# Altium PCB CM5_RP2040_MZM.PcbDoc (part 3 of 5)
Units mil, origin at the board's own origin, x right, y up, seen from the top; angles counter-clockwise.
Board outline 4724.41 x 3543.31 mil, 4 copper layers (Top Layer, GND L2, GND L3, Bottom Layer), stack 62.992 mil thick; 227 components, 122 nets, 905 pads, 3083 vias.
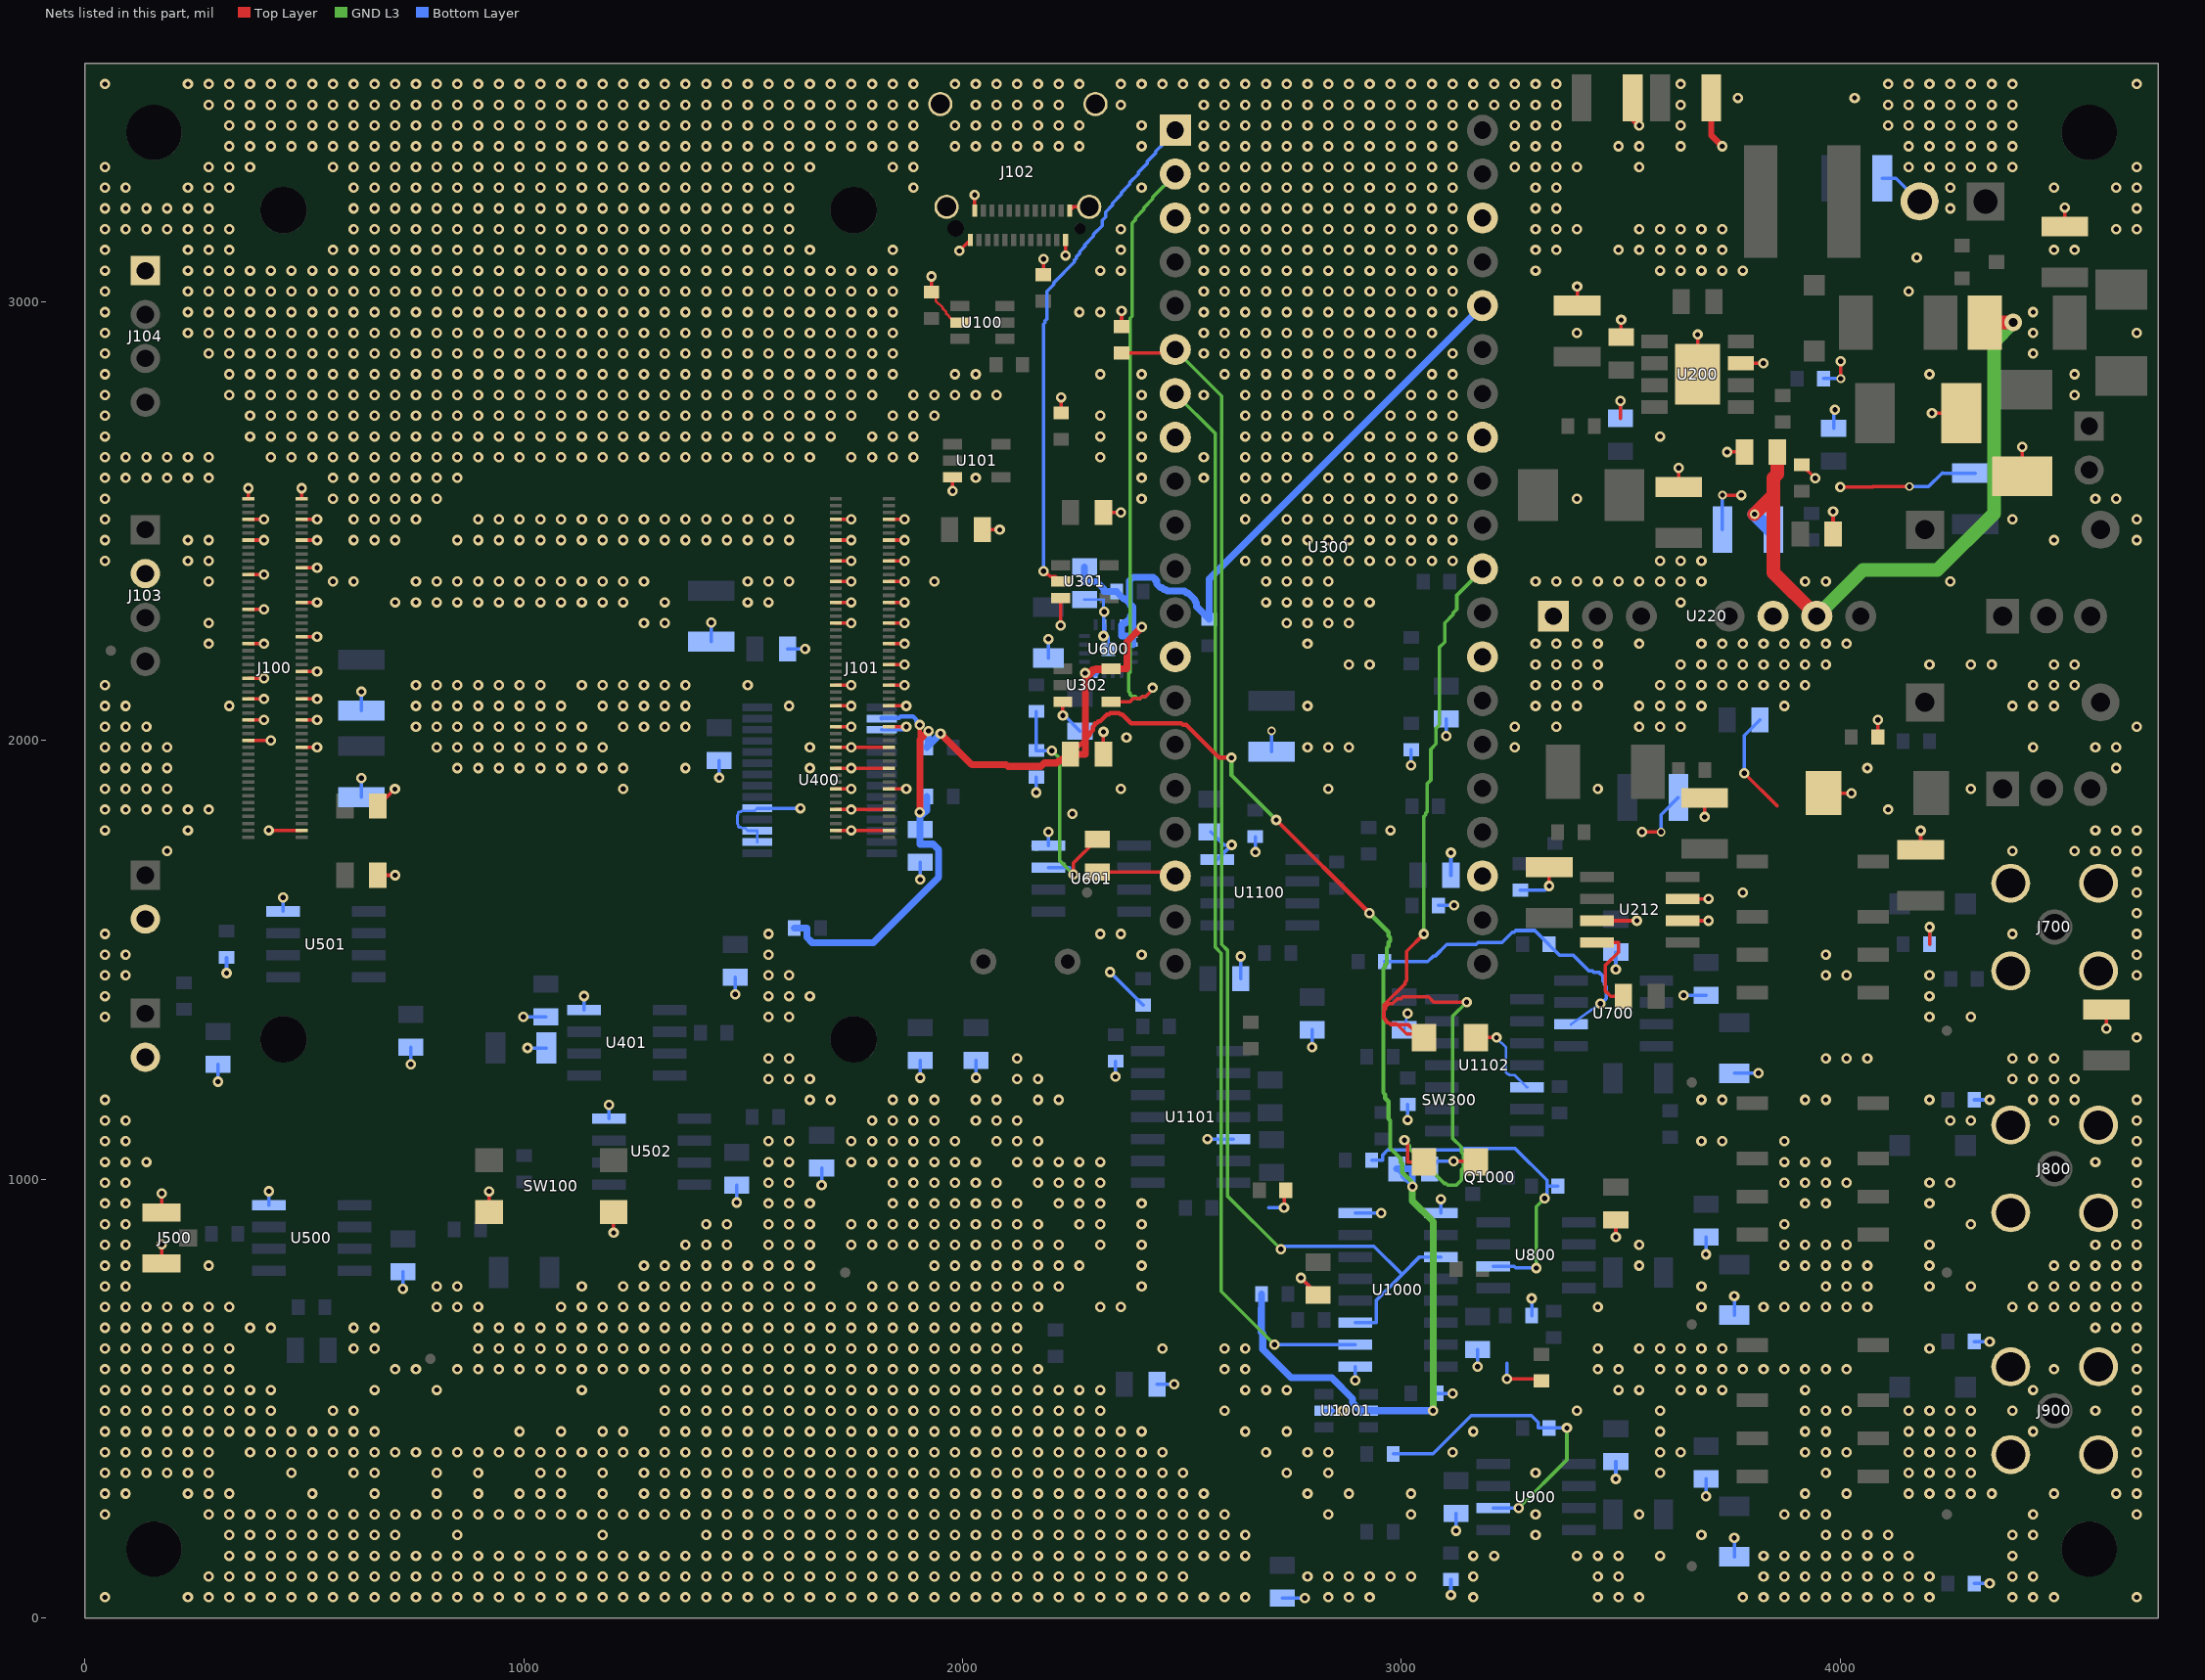
[diagram p5: the nets of this part, all layers, seen from the top]

## Via types
v1: diameter 23.62, hole 11.81, Top Layer to Bottom Layer, tented both sides, 3043 vias
v2: diameter 39.37, hole 19.68, Top Layer to Bottom Layer, tented both sides, 22 vias
v3: diameter 19.68, hole 11.81, Top Layer to Bottom Layer, tented both sides, 14 vias
v4: diameter 21.65, hole 11.81, Top Layer to Bottom Layer, tented both sides, 4 vias

## Nets (pads, with @x,y where several pads share a name; then routed paths per layer and width w, separated by ;. In a path a pad name is that pad's centre, name@x,y a point inside that pad or via, vN(x,y) a via of type N, cw(c..) or ccw(c..) an arc to the next point about the centre after c; other vN are vias at no path point) (continued)
GND: (continued)
  other v1: 45.67,47.24 234.65,47.24 281.89,47.24 329.13,47.24 376.38,47.24 423.62,47.24 470.87,47.24 518.11,47.24 565.35,47.24 612.6,47.24 659.84,47.24 707.09,47.24 754.33,47.24 801.57,47.24 848.82,47.24 896.06,47.24 943.31,47.24 990.55,47.24 1037.8,47.24 1085.04,47.24 1132.28,47.24 1179.53,47.24 1226.77,47.24 1274.02,47.24 1321.26,47.24 1368.5,47.24 1415.75,47.24 1462.99,47.24 1510.24,47.24 1557.48,47.24 1604.72,47.24 1651.97,47.24 1699.21,47.24 1746.46,47.24 1793.7,47.24 1840.94,47.24 1888.19,47.24 1935.43,47.24 1982.68,47.24 2029.92,47.24 2077.17,47.24 2124.41,47.24 2171.65,47.24 2218.9,47.24 2266.14,47.24 2313.39,47.24 2360.63,47.24 2407.87,47.24 2455.12,47.24 2502.36,47.24 2549.61,47.24 2596.85,47.24 2644.09,47.24 2833.07,47.24 2880.32,47.24 2927.56,47.24 3163.78,47.24 3447.24,47.24 3494.49,47.24 3541.73,47.24 3777.95,47.24 3825.2,47.24 3872.44,47.24 3919.68,47.24 3966.93,47.24 4014.17,47.24 4061.42,47.24 4108.66,47.24 4155.91,47.24 4203.15,47.24 4392.13,47.24 4439.37,47.24 4486.61,47.24 4675.59,47.24 281.89,94.49 329.13,94.49 376.38,94.49 423.62,94.49 470.87,94.49 518.11,94.49 565.35,94.49 612.6,94.49 659.84,94.49 707.09,94.49 754.33,94.49 801.57,94.49 848.82,94.49 896.06,94.49 943.31,94.49 990.55,94.49 1037.8,94.49 1085.04,94.49 1132.28,94.49 1179.53,94.49 1226.77,94.49 1274.02,94.49 1321.26,94.49 1368.5,94.49 1415.75,94.49 1462.99,94.49 1510.24,94.49 1557.48,94.49 1604.72,94.49 1651.97,94.49 1699.21,94.49 1746.46,94.49 1793.7,94.49 1840.94,94.49 1888.19,94.49 1935.43,94.49 1982.68,94.49 2029.92,94.49 2077.17,94.49 2124.41,94.49 2171.65,94.49 2218.9,94.49 2266.14,94.49 2313.39,94.49 2360.63,94.49 2407.87,94.49 2455.12,94.49 2502.36,94.49 2785.83,94.49 2833.07,94.49 2880.32,94.49 2927.56,94.49 2974.8,94.49 3022.05,94.49 3163.78,94.49 3447.24,94.49 3494.49,94.49 3825.2,94.49 3872.44,94.49 3919.68,94.49 3966.93,94.49 4014.17,94.49 4061.42,94.49 4108.66,94.49 4155.91,94.49 4203.15,94.49 4392.13,94.49 4439.37,94.49 329.13,141.73 376.38,141.73 423.62,141.73 470.87,141.73 518.11,141.73 565.35,141.73 612.6,141.73 659.84,141.73 707.09,141.73 754.33,141.73 801.57,141.73 848.82,141.73 896.06,141.73 943.31,141.73 990.55,141.73 1037.8,141.73 1085.04,141.73 1132.28,141.73 1179.53,141.73 1226.77,141.73 1274.02,141.73 1321.26,141.73 1368.5,141.73 1415.75,141.73 1462.99,141.73 1510.24,141.73 1557.48,141.73 1604.72,141.73 1651.97,141.73 1699.21,141.73 1746.46,141.73 1793.7,141.73 1840.94,141.73 1888.19,141.73 1935.43,141.73 1982.68,141.73 2029.92,141.73 2077.17,141.73 2124.41,141.73 2171.65,141.73 2218.9,141.73 2266.14,141.73 2313.39,141.73 2360.63,141.73 2407.87,141.73 2455.12,141.73 2502.36,141.73 2549.61,141.73 2596.85,141.73 2644.09,141.73 3163.78,141.73 3211.02,141.73 3400,141.73 3447.24,141.73 3494.49,141.73 3588.98,141.73 3825.2,141.73 3872.44,141.73 3919.68,141.73 3966.93,141.73 4014.17,141.73 4061.42,141.73 4108.66,141.73 4155.91,141.73 4392.13,141.73 329.13,188.98 376.38,188.98 423.62,188.98 470.87,188.98 518.11,188.98 565.35,188.98 612.6,188.98 659.84,188.98 707.09,188.98 848.82,188.98 1179.53,188.98 1415.75,188.98 1462.99,188.98 1510.24,188.98 1557.48,188.98 1604.72,188.98 1651.97,188.98 1699.21,188.98 1746.46,188.98 1793.7,188.98 1840.94,188.98 1888.19,188.98 1935.43,188.98 1982.68,188.98 2029.92,188.98 2077.17,188.98 2124.41,188.98 2171.65,188.98 2218.9,188.98 2266.14,188.98 2313.39,188.98 2360.63,188.98 2407.87,188.98 2455.12,188.98 2502.36,188.98 2549.61,188.98 2596.85,188.98 2644.09,188.98 3305.51,188.98 3683.46,188.98 3966.93,188.98 4014.17,188.98 4061.42,188.98 4108.66,188.98 4392.13,188.98 4439.37,188.98 45.67,236.22 281.89,236.22 329.13,236.22 376.38,236.22 423.62,236.22 470.87,236.22 518.11,236.22 565.35,236.22 612.6,236.22 659.84,236.22 707.09,236.22 754.33,236.22 801.57,236.22 848.82,236.22 896.06,236.22 943.31,236.22 990.55,236.22 1037.8,236.22 1085.04,236.22 1132.28,236.22 1179.53,236.22 1226.77,236.22 1274.02,236.22 1321.26,236.22 1368.5,236.22 1415.75,236.22 1462.99,236.22 1510.24,236.22 1557.48,236.22 1604.72,236.22 1651.97,236.22 1699.21,236.22 1746.46,236.22 1793.7,236.22 1840.94,236.22 1888.19,236.22 1935.43,236.22 1982.68,236.22 2029.92,236.22 2077.17,236.22 2124.41,236.22 2171.65,236.22 2218.9,236.22 2266.14,236.22 2313.39,236.22 2360.63,236.22 2407.87,236.22 2455.12,236.22 2502.36,236.22 2549.61,236.22 2596.85,236.22 2833.07,236.22 3022.05,236.22 3305.51,236.22 3541.73,236.22 3872.44,236.22 3919.68,236.22 3966.93,236.22 4439.37,236.22 4675.59,236.22 45.67,283.46 92.91,283.46 234.65,283.46 281.89,283.46 329.13,283.46 518.11,283.46 659.84,283.46 801.57,283.46 896.06,283.46 990.55,283.46 1037.8,283.46 1085.04,283.46 1179.53,283.46 1274.02,283.46 1321.26,283.46 1368.5,283.46 1415.75,283.46 1462.99,283.46 1510.24,283.46 1557.48,283.46 1604.72,283.46 1651.97,283.46 1699.21,283.46 1746.46,283.46 1793.7,283.46 1840.94,283.46 1888.19,283.46 1935.43,283.46 1982.68,283.46 2029.92,283.46 2077.17,283.46 2124.41,283.46 2171.65,283.46 2218.9,283.46 2266.14,283.46 2313.39,283.46 2360.63,283.46 2407.87,283.46 2455.12,283.46 2502.36,283.46 2549.61,283.46 2785.83,283.46 2880.32,283.46 3022.05,283.46 3919.68,283.46 4014.17,283.46 4155.91,283.46 4203.15,283.46 4250.39,283.46 4297.64,283.46 4344.88,283.46 4486.61,283.46 4628.35,283.46 4675.59,283.46 45.67,330.71 92.91,330.71 140.16,330.71 187.4,330.71 234.65,330.71 281.89,330.71 470.87,330.71 612.6,330.71 659.84,330.71 801.57,330.71 896.06,330.71 1037.8,330.71 1085.04,330.71 1179.53,330.71 1274.02,330.71 1321.26,330.71 1368.5,330.71 1415.75,330.71 1462.99,330.71 1510.24,330.71 1557.48,330.71 1604.72,330.71 1651.97,330.71 1699.21,330.71 1746.46,330.71 1793.7,330.71 1840.94,330.71 1888.19,330.71 1935.43,330.71 1982.68,330.71 2029.92,330.71 2077.17,330.71 2124.41,330.71 2171.65,330.71 2218.9,330.71 2266.14,330.71 2313.39,330.71 2360.63,330.71 2407.87,330.71 2455.12,330.71 2502.36,330.71 2738.58,330.71 2833.07,330.71 3305.51,330.71 3588.98,330.71 3966.93,330.71 4155.91,330.71 4203.15,330.71 4250.39,330.71 4297.64,330.71 4675.59,330.71 45.67,377.95 92.91,377.95 140.16,377.95 187.4,377.95 234.65,377.95 281.89,377.95 376.38,377.95 423.62,377.95 470.87,377.95 518.11,377.95 565.35,377.95 612.6,377.95 659.84,377.95 707.09,377.95 754.33,377.95 801.57,377.95 848.82,377.95 896.06,377.95 943.31,377.95 990.55,377.95 1037.8,377.95 1085.04,377.95 1132.28,377.95 1179.53,377.95 1226.77,377.95 1274.02,377.95 1321.26,377.95 1368.5,377.95 1415.75,377.95 1462.99,377.95 1510.24,377.95 1557.48,377.95 1604.72,377.95 1651.97,377.95 1699.21,377.95 1746.46,377.95 1793.7,377.95 1840.94,377.95 1888.19,377.95 1935.43,377.95 1982.68,377.95 2029.92,377.95 2077.17,377.95 2124.41,377.95 2171.65,377.95 2218.9,377.95 2266.14,377.95 2313.39,377.95 2360.63,377.95 2407.87,377.95 2455.12,377.95 2691.34,377.95 2785.83,377.95 2833.07,377.95 3116.54,377.95 3588.98,377.95 3636.22,377.95 3919.68,377.95 3966.93,377.95 4014.17,377.95 4155.91,377.95 4203.15,377.95 4250.39,377.95 4297.64,377.95 4675.59,377.95 45.67,425.2 92.91,425.2 140.16,425.2 187.4,425.2 234.65,425.2 281.89,425.2 329.13,425.2 376.38,425.2 423.62,425.2 470.87,425.2 518.11,425.2 565.35,425.2 612.6,425.2 659.84,425.2 990.55,425.2 1085.04,425.2 1179.53,425.2 1226.77,425.2 1321.26,425.2 1368.5,425.2 1415.75,425.2 1462.99,425.2 1510.24,425.2 1557.48,425.2 1604.72,425.2 1651.97,425.2 1699.21,425.2 1746.46,425.2 1793.7,425.2 1840.94,425.2 1888.19,425.2 1935.43,425.2 1982.68,425.2 2029.92,425.2 2077.17,425.2 2124.41,425.2 2171.65,425.2 2218.9,425.2 2266.14,425.2 2313.39,425.2 2360.63,425.2 2407.87,425.2 2644.09,425.2 2738.58,425.2 3163.78,425.2 3588.98,425.2 3919.68,425.2 3966.93,425.2 4155.91,425.2 4203.15,425.2 4250.39,425.2 4297.64,425.2 4439.37,425.2 4675.59,425.2 45.67,472.44 92.91,472.44 140.16,472.44 187.4,472.44 234.65,472.44 281.89,472.44 329.13,472.44 376.38,472.44 423.62,472.44 565.35,472.44 612.6,472.44 1321.26,472.44 1368.5,472.44 1415.75,472.44 1462.99,472.44 1510.24,472.44 1557.48,472.44 1604.72,472.44 1651.97,472.44 1699.21,472.44 1746.46,472.44 1793.7,472.44 1840.94,472.44 1888.19,472.44 1935.43,472.44 1982.68,472.44 2029.92,472.44 2077.17,472.44 2124.41,472.44 2171.65,472.44 2218.9,472.44 2266.14,472.44 2313.39,472.44 2596.85,472.44 3400,472.44 3588.98,472.44 3919.68,472.44 3966.93,472.44 4014.17,472.44 4155.91,472.44 4203.15,472.44 4250.39,472.44 4297.64,472.44 4392.13,472.44 4581.1,472.44 4675.59,472.44 45.67,519.68 92.91,519.68 140.16,519.68 187.4,519.68 234.65,519.68 281.89,519.68 329.13,519.68 376.38,519.68 423.62,519.68 659.84,519.68 801.57,519.68 1132.28,519.68 1321.26,519.68 1368.5,519.68 1415.75,519.68 1462.99,519.68 1510.24,519.68 1557.48,519.68 1604.72,519.68 1651.97,519.68 1699.21,519.68 1746.46,519.68 1793.7,519.68 1840.94,519.68 1888.19,519.68 1935.43,519.68 1982.68,519.68 2029.92,519.68 2077.17,519.68 2124.41,519.68 2171.65,519.68 2218.9,519.68 2266.14,519.68 2313.39,519.68 2644.09,519.68 2691.34,519.68 2738.58,519.68 3494.49,519.68 3541.73,519.68 3636.22,519.68 3683.46,519.68 3730.71,519.68 3919.68,519.68 4439.37,519.68 4675.59,519.68 45.67,566.93 92.91,566.93 140.16,566.93 187.4,566.93 234.65,566.93 281.89,566.93 329.13,566.93 707.09,566.93 754.33,566.93 848.82,566.93 896.06,566.93 943.31,566.93 990.55,566.93 1037.8,566.93 1085.04,566.93 1132.28,566.93 1179.53,566.93 1226.77,566.93 1274.02,566.93 1321.26,566.93 1368.5,566.93 1415.75,566.93 1462.99,566.93 1510.24,566.93 1557.48,566.93 1604.72,566.93 1651.97,566.93 1699.21,566.93 1746.46,566.93 1793.7,566.93 1840.94,566.93 1888.19,566.93 1935.43,566.93 1982.68,566.93 2029.92,566.93 2077.17,566.93 2124.41,566.93 2171.65,566.93 2596.85,566.93 2644.09,566.93 3447.24,566.93 3494.49,566.93 3588.98,566.93 3636.22,566.93 3683.46,566.93 3730.71,566.93 3777.95,566.93 3825.2,566.93 3872.44,566.93 3919.68,566.93 3966.93,566.93 4014.17,566.93 4486.61,566.93 4675.59,566.93 45.67,614.17 92.91,614.17 140.16,614.17 187.4,614.17 234.65,614.17 281.89,614.17 329.13,614.17 612.6,614.17 659.84,614.17 896.06,614.17 943.31,614.17 990.55,614.17 1037.8,614.17 1085.04,614.17 1132.28,614.17 1179.53,614.17 1226.77,614.17 1274.02,614.17 1321.26,614.17 1368.5,614.17 1415.75,614.17 1462.99,614.17 1510.24,614.17 1557.48,614.17 1604.72,614.17 1651.97,614.17 1699.21,614.17 1746.46,614.17 1793.7,614.17 1840.94,614.17 1888.19,614.17 1935.43,614.17 1982.68,614.17 2029.92,614.17 2077.17,614.17 2124.41,614.17 2455.12,614.17 2596.85,614.17 2644.09,614.17 3447.24,614.17 3541.73,614.17 3588.98,614.17 3636.22,614.17 3683.46,614.17 3730.71,614.17 4203.15,614.17 4675.59,614.17 45.67,661.42 92.91,661.42 140.16,661.42 187.4,661.42 234.65,661.42 281.89,661.42 376.38,661.42 423.62,661.42 612.6,661.42 659.84,661.42 896.06,661.42 943.31,661.42 990.55,661.42 1037.8,661.42 1085.04,661.42 1132.28,661.42 1179.53,661.42 1226.77,661.42 1274.02,661.42 1321.26,661.42 1368.5,661.42 1415.75,661.42 1462.99,661.42 1510.24,661.42 1557.48,661.42 1604.72,661.42 1651.97,661.42 1699.21,661.42 1746.46,661.42 1793.7,661.42 1840.94,661.42 1888.19,661.42 1935.43,661.42 1982.68,661.42 2029.92,661.42 2077.17,661.42 2124.41,661.42 4581.1,661.42 4628.35,661.42 4675.59,661.42 45.67,708.66 92.91,708.66 140.16,708.66 187.4,708.66 234.65,708.66 281.89,708.66 329.13,708.66 801.57,708.66 848.82,708.66 896.06,708.66 1085.04,708.66 1132.28,708.66 1179.53,708.66 1226.77,708.66 1274.02,708.66 1321.26,708.66 1368.5,708.66 1415.75,708.66 1462.99,708.66 1510.24,708.66 1557.48,708.66 1604.72,708.66 1651.97,708.66 1699.21,708.66 1746.46,708.66 1793.7,708.66 1840.94,708.66 1888.19,708.66 1935.43,708.66 1982.68,708.66 2029.92,708.66 2077.17,708.66 2124.41,708.66 2171.65,708.66 2313.39,708.66 2360.63,708.66 3447.24,708.66 3683.46,708.66 3825.2,708.66 3872.44,708.66 3919.68,708.66 3966.93,708.66 4014.17,708.66 4061.42,708.66 4392.13,708.66 4439.37,708.66 4486.61,708.66 4533.86,708.66 4581.1,708.66 4628.35,708.66 4675.59,708.66 45.67,755.91 92.91,755.91 801.57,755.91 848.82,755.91 1132.28,755.91 1226.77,755.91 1274.02,755.91 1321.26,755.91 1368.5,755.91 1415.75,755.91 1462.99,755.91 1510.24,755.91 1557.48,755.91 1604.72,755.91 1651.97,755.91 1793.7,755.91 1840.94,755.91 1888.19,755.91 1935.43,755.91 1982.68,755.91 2029.92,755.91 2077.17,755.91 2124.41,755.91 2171.65,755.91 2218.9,755.91 2407.87,755.91 3683.46,755.91 3966.93,755.91 4014.17,755.91 4061.42,755.91 4203.15,755.91 4297.64,755.91 4439.37,755.91 4486.61,755.91 4533.86,755.91 4581.1,755.91 4628.35,755.91 4675.59,755.91 45.67,803.15 92.91,803.15 281.89,803.15 1274.02,803.15 1321.26,803.15 1368.5,803.15 1415.75,803.15 1462.99,803.15 1510.24,803.15 1557.48,803.15 1604.72,803.15 1651.97,803.15 1935.43,803.15 1982.68,803.15 2029.92,803.15 2077.17,803.15 2124.41,803.15 2171.65,803.15 2218.9,803.15 2266.14,803.15 2407.87,803.15 3541.73,803.15 3872.44,803.15 3919.68,803.15 3966.93,803.15 4014.17,803.15 4061.42,803.15 4203.15,803.15 4486.61,803.15 4533.86,803.15 4581.1,803.15 4628.35,803.15 4675.59,803.15 45.67,850.39 92.91,850.39 1368.5,850.39 1415.75,850.39 1462.99,850.39 1557.48,850.39 1604.72,850.39 1651.97,850.39 1746.46,850.39 1793.7,850.39 1840.94,850.39 1888.19,850.39 1935.43,850.39 1982.68,850.39 2029.92,850.39 2077.17,850.39 2124.41,850.39 2171.65,850.39 2218.9,850.39 2313.39,850.39 2407.87,850.39 3541.73,850.39 3872.44,850.39 3919.68,850.39 3966.93,850.39 4014.17,850.39 4203.15,850.39 4581.1,850.39 4628.35,850.39 4675.59,850.39 45.67,897.64 92.91,897.64 1415.75,897.64 1462.99,897.64 1557.48,897.64 1604.72,897.64 1651.97,897.64 1746.46,897.64 1793.7,897.64 1840.94,897.64 1888.19,897.64 1935.43,897.64 1982.68,897.64 2029.92,897.64 2077.17,897.64 2124.41,897.64 2171.65,897.64 2266.14,897.64 2313.39,897.64 2407.87,897.64 3872.44,897.64 4297.64,897.64 4675.59,897.64 45.67,944.88 92.91,944.88 1557.48,944.88 1604.72,944.88 1651.97,944.88 1840.94,944.88 1888.19,944.88 1935.43,944.88 1982.68,944.88 2029.92,944.88 2077.17,944.88 2124.41,944.88 2218.9,944.88 2266.14,944.88 2313.39,944.88 2407.87,944.88 3919.68,944.88 3966.93,944.88 4203.15,944.88 4675.59,944.88 45.67,992.13 92.91,992.13 1557.48,992.13 1604.72,992.13 1840.94,992.13 1888.19,992.13 1935.43,992.13 1982.68,992.13 2029.92,992.13 2077.17,992.13 2171.65,992.13 2218.9,992.13 2266.14,992.13 2313.39,992.13 3872.44,992.13 3919.68,992.13 3966.93,992.13 4014.17,992.13 4203.15,992.13 4250.39,992.13 4675.59,992.13 45.67,1039.37 92.91,1039.37 140.16,1039.37 1557.48,1039.37 1604.72,1039.37 1746.46,1039.37 1793.7,1039.37 1840.94,1039.37 1888.19,1039.37 1935.43,1039.37 1982.68,1039.37 2029.92,1039.37 2124.41,1039.37 2171.65,1039.37 2218.9,1039.37 2266.14,1039.37 2313.39,1039.37 3872.44,1039.37 3919.68,1039.37 3966.93,1039.37 4581.1,1039.37 4675.59,1039.37 45.67,1086.61 92.91,1086.61 1557.48,1086.61 1604.72,1086.61 1746.46,1086.61 1793.7,1086.61 1840.94,1086.61 1888.19,1086.61 1935.43,1086.61 1982.68,1086.61 2077.17,1086.61 2124.41,1086.61 2171.65,1086.61 3683.46,1086.61 3730.71,1086.61 3872.44,1086.61 4675.59,1086.61 45.67,1133.86 92.91,1133.86 1793.7,1133.86 1840.94,1133.86 1888.19,1133.86 1935.43,1133.86 2029.92,1133.86 2077.17,1133.86 2124.41,1133.86 4250.39,1133.86 4297.64,1133.86 4486.61,1133.86 4675.59,1133.86 45.67,1181.1 1651.97,1181.1 1699.21,1181.1 1840.94,1181.1 1888.19,1181.1 1935.43,1181.1 2029.92,1181.1 2077.17,1181.1 2171.65,1181.1 2218.9,1181.1 3683.46,1181.1 3730.71,1181.1 3919.68,1181.1 3966.93,1181.1 4203.15,1181.1 4439.37,1181.1 4486.61,1181.1 4533.86,1181.1 4675.59,1181.1 1557.48,1228.35 1604.72,1228.35 1651.97,1228.35 2124.41,1228.35 2171.65,1228.35 4392.13,1228.35 4439.37,1228.35 4486.61,1228.35 4533.86,1228.35 1557.48,1275.59 1604.72,1275.59 2124.41,1275.59 3966.93,1275.59 4014.17,1275.59 4061.42,1275.59 4392.13,1275.59 4439.37,1275.59 4486.61,1275.59 4675.59,1322.83 45.67,1370.08 1557.48,1370.08 1604.72,1370.08 4203.15,1370.08 4297.64,1370.08 45.67,1417.32 1557.48,1417.32 1604.72,1417.32 1651.97,1417.32 4203.15,1417.32 45.67,1464.57 92.91,1464.57 1557.48,1464.57 1604.72,1464.57 3966.93,1464.57 4014.17,1464.57 4203.15,1464.57 4675.59,1464.57 45.67,1511.81 92.91,1511.81 1557.48,1511.81 2407.87,1511.81 3966.93,1511.81 4675.59,1511.81 45.67,1559.06 1557.48,1559.06 2313.39,1559.06 2360.63,1559.06 4392.13,1559.06 4675.59,1559.06 4675.59,1606.3 3777.95,1653.54 4675.59,1653.54 4675.59,1700.79 187.4,1748.03 4392.13,1748.03 4533.86,1748.03 4581.1,1748.03 4628.35,1748.03 4675.59,1748.03 45.67,1795.28 234.65,1795.28 2974.8,1795.28 4581.1,1795.28 4628.35,1795.28 4675.59,1795.28 2250.16,1832.68 45.67,1842.52 92.91,1842.52 140.16,1842.52 187.4,1842.52 234.65,1842.52 281.89,1842.52 4108.66,1842.52 45.67,1889.76 92.91,1889.76 140.16,1889.76 187.4,1889.76 1226.77,1889.76 2360.63,1889.76 2833.07,1889.76 3447.24,1889.76 4297.64,1889.76 45.67,1937.01 92.91,1937.01 140.16,1937.01 187.4,1937.01 848.82,1937.01 896.06,1937.01 943.31,1937.01 990.55,1937.01 1037.8,1937.01 1085.04,1937.01 1132.28,1937.01 1179.53,1937.01 1226.77,1937.01 1368.5,1937.01 1651.97,1937.01 4061.42,1937.01 4628.35,1937.01 45.67,1984.25 92.91,1984.25 140.16,1984.25 187.4,1984.25 801.57,1984.25 848.82,1984.25 896.06,1984.25 943.31,1984.25 990.55,1984.25 1037.8,1984.25 1085.04,1984.25 1132.28,1984.25 1179.53,1984.25 1651.97,1984.25 2785.83,1984.25 2833.07,1984.25 2880.32,1984.25 3258.27,1984.25 4439.37,1984.25 4581.1,1984.25 4628.35,1984.25 2373.35,2006.89 45.67,2031.5 92.91,2031.5 140.16,2031.5 754.33,2031.5 801.57,2031.5 848.82,2031.5 896.06,2031.5 943.31,2031.5 990.55,2031.5 1037.8,2031.5 1085.04,2031.5 1132.28,2031.5 1226.77,2031.5 1274.02,2031.5 1321.26,2031.5 1368.5,2031.5 3258.27,2031.5 3352.76,2031.5 3541.73,2031.5 3588.98,2031.5 3636.22,2031.5 4675.59,2031.5 45.67,2078.74 92.91,2078.74 329.13,2078.74 754.33,2078.74 801.57,2078.74 848.82,2078.74 896.06,2078.74 943.31,2078.74 990.55,2078.74 1037.8,2078.74 1085.04,2078.74 1179.53,2078.74 1226.77,2078.74 1274.02,2078.74 1321.26,2078.74 1368.5,2078.74 1604.72,2078.74 2785.83,2078.74 3305.51,2078.74 3352.76,2078.74 3400,2078.74 3541.73,2078.74 3588.98,2078.74 3636.22,2078.74 3683.46,2078.74 3872.44,2078.74 4392.13,2078.74 4439.37,2078.74 4486.61,2078.74 45.67,2125.98 754.33,2125.98 801.57,2125.98 848.82,2125.98 896.06,2125.98 943.31,2125.98 990.55,2125.98 1037.8,2125.98 1132.28,2125.98 1179.53,2125.98 1226.77,2125.98 1274.02,2125.98 1321.26,2125.98 1368.5,2125.98 1510.24,2125.98 3305.51,2125.98 3352.76,2125.98 3400,2125.98 3447.24,2125.98 3588.98,2125.98 3636.22,2125.98 3683.46,2125.98 3730.71,2125.98 3777.95,2125.98 3825.2,2125.98 3872.44,2125.98 3919.68,2125.98 4439.37,2125.98 4486.61,2125.98 4533.86,2125.98 2880.32,2173.23 2927.56,2173.23 3305.51,2173.23 3352.76,2173.23 3400,2173.23 3447.24,2173.23 3636.22,2173.23 3683.46,2173.23 3730.71,2173.23 3777.95,2173.23 3825.2,2173.23 3872.44,2173.23 3919.68,2173.23 3966.93,2173.23 4203.15,2173.23 4297.64,2173.23 4344.88,2173.23 4486.61,2173.23 4533.86,2173.23 281.89,2220.47 2785.83,2220.47 3305.51,2220.47 3352.76,2220.47 3400,2220.47 3447.24,2220.47 3541.73,2220.47 3683.46,2220.47 3730.71,2220.47 3777.95,2220.47 3825.2,2220.47 3872.44,2220.47 3919.68,2220.47 3966.93,2220.47 4014.17,2220.47 281.89,2267.72 1274.02,2267.72 1321.26,2267.72 2738.58,2267.72 2785.83,2267.72 2833.07,2267.72 2880.32,2267.72 707.09,2314.96 754.33,2314.96 801.57,2314.96 848.82,2314.96 896.06,2314.96 943.31,2314.96 990.55,2314.96 1037.8,2314.96 1085.04,2314.96 1132.28,2314.96 1179.53,2314.96 1226.77,2314.96 1321.26,2314.96 1510.24,2314.96 1557.48,2314.96 2691.34,2314.96 2738.58,2314.96 2785.83,2314.96 2833.07,2314.96 2880.32,2314.96 2927.56,2314.96 3636.22,2314.96 281.89,2362.2 565.35,2362.2 612.6,2362.2 754.33,2362.2 801.57,2362.2 848.82,2362.2 896.06,2362.2 943.31,2362.2 990.55,2362.2 1037.8,2362.2 1085.04,2362.2 1132.28,2362.2 1179.53,2362.2 1226.77,2362.2 1274.02,2362.2 1510.24,2362.2 1557.48,2362.2 1604.72,2362.2 1935.43,2362.2 2691.34,2362.2 2738.58,2362.2 2785.83,2362.2 2833.07,2362.2 3305.51,2362.2 3352.76,2362.2 3400,2362.2 3447.24,2362.2 3494.49,2362.2 3541.73,2362.2 3588.98,2362.2 3636.22,2362.2 3683.46,2362.2 3919.68,2362.2 3966.93,2362.2 4250.39,2362.2 45.67,2409.45 234.65,2409.45 281.89,2409.45 2644.09,2409.45 2691.34,2409.45 2738.58,2409.45 2785.83,2409.45 2833.07,2409.45 2880.32,2409.45 2927.56,2409.45 2974.8,2409.45 3022.05,2409.45 3069.29,2409.45 3116.54,2409.45 3588.98,2409.45 3636.22,2409.45 3683.46,2409.45 45.67,2456.69 234.65,2456.69 281.89,2456.69 612.6,2456.69 659.84,2456.69 707.09,2456.69 848.82,2456.69 896.06,2456.69 943.31,2456.69 990.55,2456.69 1037.8,2456.69 1085.04,2456.69 1132.28,2456.69 1179.53,2456.69 1226.77,2456.69 1274.02,2456.69 1321.26,2456.69 1368.5,2456.69 1415.75,2456.69 1462.99,2456.69 1510.24,2456.69 1557.48,2456.69 1604.72,2456.69 2691.34,2456.69 2738.58,2456.69 2785.83,2456.69 2833.07,2456.69 2880.32,2456.69 2927.56,2456.69 2974.8,2456.69 3022.05,2456.69 3069.29,2456.69 3116.54,2456.69 4486.61,2456.69 4675.59,2456.69 45.67,2503.94 612.6,2503.94 659.84,2503.94 707.09,2503.94 754.33,2503.94 896.06,2503.94 943.31,2503.94 990.55,2503.94 1037.8,2503.94 1085.04,2503.94 1132.28,2503.94 1179.53,2503.94 1226.77,2503.94 1274.02,2503.94 1321.26,2503.94 1368.5,2503.94 1415.75,2503.94 1462.99,2503.94 1510.24,2503.94 1557.48,2503.94 1604.72,2503.94 2644.09,2503.94 2738.58,2503.94 2785.83,2503.94 2833.07,2503.94 2880.32,2503.94 2927.56,2503.94 2974.8,2503.94 3022.05,2503.94 3069.29,2503.94 3116.54,2503.94 4392.13,2503.94 4675.59,2503.94 45.67,2551.18 565.35,2551.18 612.6,2551.18 659.84,2551.18 707.09,2551.18 754.33,2551.18 801.57,2551.18 2407.87,2551.18 2644.09,2551.18 2691.34,2551.18 2785.83,2551.18 2833.07,2551.18 2880.32,2551.18 2927.56,2551.18 2974.8,2551.18 3022.05,2551.18 3069.29,2551.18 3116.54,2551.18 3400,2551.18 4581.1,2551.18 4628.35,2551.18 45.67,2598.43 92.91,2598.43 140.16,2598.43 187.4,2598.43 234.65,2598.43 281.89,2598.43 565.35,2598.43 612.6,2598.43 659.84,2598.43 707.09,2598.43 754.33,2598.43 801.57,2598.43 848.82,2598.43 2029.92,2598.43 2407.87,2598.43 2549.61,2598.43 2644.09,2598.43 2691.34,2598.43 2738.58,2598.43 2833.07,2598.43 2880.32,2598.43 2927.56,2598.43 2974.8,2598.43 3022.05,2598.43 3069.29,2598.43 3116.54,2598.43 45.67,2645.67 92.91,2645.67 140.16,2645.67 187.4,2645.67 234.65,2645.67 281.89,2645.67 423.62,2645.67 470.87,2645.67 518.11,2645.67 565.35,2645.67 612.6,2645.67 659.84,2645.67 707.09,2645.67 754.33,2645.67 801.57,2645.67 848.82,2645.67 896.06,2645.67 943.31,2645.67 990.55,2645.67 1037.8,2645.67 1085.04,2645.67 1132.28,2645.67 1179.53,2645.67 1226.77,2645.67 1274.02,2645.67 1321.26,2645.67 1368.5,2645.67 1415.75,2645.67 1462.99,2645.67 1510.24,2645.67 1557.48,2645.67 1604.72,2645.67 1651.97,2645.67 1746.46,2645.67 1793.7,2645.67 1840.94,2645.67 1888.19,2645.67 2313.39,2645.67 2407.87,2645.67 2549.61,2645.67 2644.09,2645.67 2691.34,2645.67 2738.58,2645.67 2785.83,2645.67 2880.32,2645.67 2927.56,2645.67 2974.8,2645.67 3022.05,2645.67 3069.29,2645.67 3116.54,2645.67 45.67,2692.91 376.38,2692.91 423.62,2692.91 470.87,2692.91 518.11,2692.91 565.35,2692.91 612.6,2692.91 659.84,2692.91 707.09,2692.91 754.33,2692.91 801.57,2692.91 848.82,2692.91 896.06,2692.91 943.31,2692.91 990.55,2692.91 1037.8,2692.91 1085.04,2692.91 1132.28,2692.91 1179.53,2692.91 1226.77,2692.91 1274.02,2692.91 1321.26,2692.91 1368.5,2692.91 1415.75,2692.91 1462.99,2692.91 1510.24,2692.91 1557.48,2692.91 1604.72,2692.91 1651.97,2692.91 1699.21,2692.91 1793.7,2692.91 1840.94,2692.91 1888.19,2692.91 2313.39,2692.91 2407.87,2692.91 2644.09,2692.91 2691.34,2692.91 2738.58,2692.91 2785.83,2692.91 2833.07,2692.91 2927.56,2692.91 2974.8,2692.91 3022.05,2692.91 3069.29,2692.91 3116.54,2692.91 3588.98,2692.91 45.67,2740.16 376.38,2740.16 423.62,2740.16 470.87,2740.16 518.11,2740.16 565.35,2740.16 612.6,2740.16 659.84,2740.16 707.09,2740.16 754.33,2740.16 801.57,2740.16 848.82,2740.16 896.06,2740.16 943.31,2740.16 990.55,2740.16 1037.8,2740.16 1085.04,2740.16 1132.28,2740.16 1179.53,2740.16 1226.77,2740.16 1274.02,2740.16 1321.26,2740.16 1368.5,2740.16 1415.75,2740.16 1462.99,2740.16 1510.24,2740.16 1557.48,2740.16 1604.72,2740.16 1651.97,2740.16 1699.21,2740.16 1746.46,2740.16 1840.94,2740.16 1888.19,2740.16 1935.43,2740.16 2313.39,2740.16 2407.87,2740.16 2644.09,2740.16 2691.34,2740.16 2738.58,2740.16 2785.83,2740.16 2833.07,2740.16 2880.32,2740.16 2974.8,2740.16 3022.05,2740.16 3069.29,2740.16 3116.54,2740.16 45.67,2787.4 329.13,2787.4 376.38,2787.4 423.62,2787.4 470.87,2787.4 518.11,2787.4 565.35,2787.4 612.6,2787.4 659.84,2787.4 707.09,2787.4 754.33,2787.4 801.57,2787.4 848.82,2787.4 896.06,2787.4 943.31,2787.4 990.55,2787.4 1037.8,2787.4 1085.04,2787.4 1132.28,2787.4 1179.53,2787.4 1226.77,2787.4 1274.02,2787.4 1321.26,2787.4 1368.5,2787.4 1415.75,2787.4 1462.99,2787.4 1510.24,2787.4 1557.48,2787.4 1604.72,2787.4 1651.97,2787.4 1699.21,2787.4 1746.46,2787.4 1793.7,2787.4 1888.19,2787.4 1935.43,2787.4 1982.68,2787.4 2029.92,2787.4 2077.17,2787.4 2407.87,2787.4 2549.61,2787.4 2644.09,2787.4 2691.34,2787.4 2738.58,2787.4 2785.83,2787.4 2833.07,2787.4 2880.32,2787.4 2927.56,2787.4 3022.05,2787.4 3069.29,2787.4 3116.54,2787.4 4533.86,2787.4 45.67,2834.65 329.13,2834.65 376.38,2834.65 423.62,2834.65 470.87,2834.65 518.11,2834.65 565.35,2834.65 612.6,2834.65 659.84,2834.65 707.09,2834.65 754.33,2834.65 801.57,2834.65 848.82,2834.65 896.06,2834.65 943.31,2834.65 990.55,2834.65 1037.8,2834.65 1085.04,2834.65 1132.28,2834.65 1179.53,2834.65 1226.77,2834.65 1274.02,2834.65 1321.26,2834.65 1368.5,2834.65 1415.75,2834.65 1462.99,2834.65 1510.24,2834.65 1557.48,2834.65 1604.72,2834.65 1651.97,2834.65 1699.21,2834.65 1746.46,2834.65 1793.7,2834.65 1840.94,2834.65 1982.68,2834.65 2029.92,2834.65 2313.39,2834.65 2407.87,2834.65 2596.85,2834.65 2644.09,2834.65 2691.34,2834.65 2738.58,2834.65 2785.83,2834.65 2833.07,2834.65 2880.32,2834.65 2927.56,2834.65 2974.8,2834.65 3069.29,2834.65 3116.54,2834.65 4203.15,2834.65 4533.86,2834.65 45.67,2881.89 281.89,2881.89 329.13,2881.89 376.38,2881.89 423.62,2881.89 470.87,2881.89 518.11,2881.89 565.35,2881.89 612.6,2881.89 659.84,2881.89 707.09,2881.89 754.33,2881.89 801.57,2881.89 848.82,2881.89 896.06,2881.89 943.31,2881.89 990.55,2881.89 1037.8,2881.89 1085.04,2881.89 1132.28,2881.89 1179.53,2881.89 1226.77,2881.89 1274.02,2881.89 1321.26,2881.89 1368.5,2881.89 1415.75,2881.89 1462.99,2881.89 1510.24,2881.89 1557.48,2881.89 1604.72,2881.89 1651.97,2881.89 1699.21,2881.89 1746.46,2881.89 1793.7,2881.89 1840.94,2881.89 2549.61,2881.89 2596.85,2881.89 2644.09,2881.89 2691.34,2881.89 2738.58,2881.89 2785.83,2881.89 2833.07,2881.89 2880.32,2881.89 2927.56,2881.89 2974.8,2881.89 3022.05,2881.89 3116.54,2881.89 4439.37,2881.89 45.67,2929.13 234.65,2929.13 281.89,2929.13 329.13,2929.13 376.38,2929.13 423.62,2929.13 470.87,2929.13 518.11,2929.13 565.35,2929.13 612.6,2929.13 659.84,2929.13 707.09,2929.13 754.33,2929.13 801.57,2929.13 848.82,2929.13 896.06,2929.13 943.31,2929.13 990.55,2929.13 1037.8,2929.13 1085.04,2929.13 1132.28,2929.13 1179.53,2929.13 1226.77,2929.13 1274.02,2929.13 1321.26,2929.13 1368.5,2929.13 1415.75,2929.13 1462.99,2929.13 1510.24,2929.13 1557.48,2929.13 1604.72,2929.13 1651.97,2929.13 1699.21,2929.13 1746.46,2929.13 1793.7,2929.13 1840.94,2929.13 2549.61,2929.13 2596.85,2929.13 2644.09,2929.13 2691.34,2929.13 2738.58,2929.13 2785.83,2929.13 2833.07,2929.13 2880.32,2929.13 2927.56,2929.13 2974.8,2929.13 3022.05,2929.13 3069.29,2929.13 3400,2929.13 4439.37,2929.13 4675.59,2929.13 45.67,2976.38 234.65,2976.38 281.89,2976.38 329.13,2976.38 376.38,2976.38 423.62,2976.38 470.87,2976.38 518.11,2976.38 565.35,2976.38 612.6,2976.38 659.84,2976.38 707.09,2976.38 754.33,2976.38 801.57,2976.38 848.82,2976.38 896.06,2976.38 943.31,2976.38 990.55,2976.38 1037.8,2976.38 1085.04,2976.38 1132.28,2976.38 1179.53,2976.38 1226.77,2976.38 1274.02,2976.38 1321.26,2976.38 1368.5,2976.38 1415.75,2976.38 1462.99,2976.38 1510.24,2976.38 1557.48,2976.38 1604.72,2976.38 1651.97,2976.38 1699.21,2976.38 1746.46,2976.38 1793.7,2976.38 1840.94,2976.38 2266.14,2976.38 2313.39,2976.38 2549.61,2976.38 2596.85,2976.38 2644.09,2976.38 2691.34,2976.38 2738.58,2976.38 2785.83,2976.38 2833.07,2976.38 2880.32,2976.38 2927.56,2976.38 2974.8,2976.38 3022.05,2976.38 3069.29,2976.38 3116.54,2976.38 4439.37,2976.38 45.67,3023.62 234.65,3023.62 281.89,3023.62 329.13,3023.62 376.38,3023.62 423.62,3023.62 470.87,3023.62 518.11,3023.62 565.35,3023.62 612.6,3023.62 659.84,3023.62 707.09,3023.62 754.33,3023.62 801.57,3023.62 848.82,3023.62 896.06,3023.62 943.31,3023.62 990.55,3023.62 1037.8,3023.62 1085.04,3023.62 1132.28,3023.62 1179.53,3023.62 1226.77,3023.62 1274.02,3023.62 1321.26,3023.62 1368.5,3023.62 1415.75,3023.62 1462.99,3023.62 1510.24,3023.62 1557.48,3023.62 1604.72,3023.62 1651.97,3023.62 1699.21,3023.62 1746.46,3023.62 1793.7,3023.62 1840.94,3023.62 2549.61,3023.62 2596.85,3023.62 2644.09,3023.62 2691.34,3023.62 2738.58,3023.62 2785.83,3023.62 2833.07,3023.62 2880.32,3023.62 2927.56,3023.62 2974.8,3023.62 3022.05,3023.62 3069.29,3023.62 3116.54,3023.62 4155.91,3023.62 45.67,3070.87 234.65,3070.87 281.89,3070.87 329.13,3070.87 376.38,3070.87 423.62,3070.87 470.87,3070.87 518.11,3070.87 565.35,3070.87 612.6,3070.87 659.84,3070.87 707.09,3070.87 754.33,3070.87 801.57,3070.87 848.82,3070.87 896.06,3070.87 943.31,3070.87 990.55,3070.87 1037.8,3070.87 1085.04,3070.87 1132.28,3070.87 1179.53,3070.87 1226.77,3070.87 1274.02,3070.87 1321.26,3070.87 1368.5,3070.87 1415.75,3070.87 1462.99,3070.87 1510.24,3070.87 1557.48,3070.87 1604.72,3070.87 1651.97,3070.87 1699.21,3070.87 1746.46,3070.87 1793.7,3070.87 1840.94,3070.87 2313.39,3070.87 2360.63,3070.87 2549.61,3070.87 2596.85,3070.87 2644.09,3070.87 2691.34,3070.87 2738.58,3070.87 2785.83,3070.87 2833.07,3070.87 2880.32,3070.87 2927.56,3070.87 2974.8,3070.87 3022.05,3070.87 3069.29,3070.87 3116.54,3070.87 3305.51,3070.87 3588.98,3070.87 3636.22,3070.87 3683.46,3070.87 3730.71,3070.87 3777.95,3070.87 4174.21,3100.39 45.67,3118.11 234.65,3118.11 281.89,3118.11 329.13,3118.11 565.35,3118.11 612.6,3118.11 659.84,3118.11 707.09,3118.11 754.33,3118.11 801.57,3118.11 848.82,3118.11 896.06,3118.11 943.31,3118.11 990.55,3118.11 1037.8,3118.11 1085.04,3118.11 1132.28,3118.11 1179.53,3118.11 1226.77,3118.11 1274.02,3118.11 1321.26,3118.11 1368.5,3118.11 1415.75,3118.11 1462.99,3118.11 1510.24,3118.11 1557.48,3118.11 1604.72,3118.11 1651.97,3118.11 1840.94,3118.11 2360.63,3118.11 2549.61,3118.11 2596.85,3118.11 2644.09,3118.11 2691.34,3118.11 2738.58,3118.11 2785.83,3118.11 2833.07,3118.11 2880.32,3118.11 2927.56,3118.11 2974.8,3118.11 3022.05,3118.11 3069.29,3118.11 3116.54,3118.11 3305.51,3118.11 3352.76,3118.11 3494.49,3118.11 3541.73,3118.11 3588.98,3118.11 3636.22,3118.11 3683.46,3118.11 3730.71,3118.11 4486.61,3118.11 4533.86,3118.11 45.67,3165.35 92.91,3165.35 140.16,3165.35 187.4,3165.35 234.65,3165.35 281.89,3165.35 329.13,3165.35 612.6,3165.35 659.84,3165.35 707.09,3165.35 754.33,3165.35 801.57,3165.35 848.82,3165.35 896.06,3165.35 943.31,3165.35 990.55,3165.35 1037.8,3165.35 1085.04,3165.35 1132.28,3165.35 1179.53,3165.35 1226.77,3165.35 1274.02,3165.35 1321.26,3165.35 1368.5,3165.35 1415.75,3165.35 1462.99,3165.35 1510.24,3165.35 1557.48,3165.35 1604.72,3165.35 2360.63,3165.35 2549.61,3165.35 2596.85,3165.35 2644.09,3165.35 2691.34,3165.35 2738.58,3165.35 2785.83,3165.35 2833.07,3165.35 2880.32,3165.35 2927.56,3165.35 2974.8,3165.35 3022.05,3165.35 3069.29,3165.35 3116.54,3165.35 3305.51,3165.35 3352.76,3165.35 3400,3165.35 3541.73,3165.35 3588.98,3165.35 3636.22,3165.35 3683.46,3165.35 3730.71,3165.35 4628.35,3165.35 4675.59,3165.35 45.67,3212.6 92.91,3212.6 140.16,3212.6 187.4,3212.6 234.65,3212.6 281.89,3212.6 612.6,3212.6 659.84,3212.6 707.09,3212.6 754.33,3212.6 801.57,3212.6 848.82,3212.6 896.06,3212.6 943.31,3212.6 990.55,3212.6 1037.8,3212.6 1085.04,3212.6 1132.28,3212.6 1179.53,3212.6 1226.77,3212.6 1274.02,3212.6 1321.26,3212.6 1368.5,3212.6 1415.75,3212.6 1462.99,3212.6 1510.24,3212.6 1557.48,3212.6 1604.72,3212.6 2549.61,3212.6 2596.85,3212.6 2644.09,3212.6 2691.34,3212.6 2738.58,3212.6 2785.83,3212.6 2833.07,3212.6 2880.32,3212.6 2927.56,3212.6 2974.8,3212.6 3022.05,3212.6 3069.29,3212.6 3116.54,3212.6 3305.51,3212.6 3352.76,3212.6 4250.39,3212.6 4675.59,3212.6 45.67,3259.84 92.91,3259.84 234.65,3259.84 281.89,3259.84 329.13,3259.84 612.6,3259.84 659.84,3259.84 707.09,3259.84 754.33,3259.84 801.57,3259.84 848.82,3259.84 896.06,3259.84 943.31,3259.84 990.55,3259.84 1037.8,3259.84 1085.04,3259.84 1132.28,3259.84 1179.53,3259.84 1226.77,3259.84 1274.02,3259.84 1321.26,3259.84 1368.5,3259.84 1415.75,3259.84 1462.99,3259.84 1510.24,3259.84 1557.48,3259.84 1604.72,3259.84 1888.19,3259.84 2407.87,3259.84 2549.61,3259.84 2596.85,3259.84 2644.09,3259.84 2691.34,3259.84 2738.58,3259.84 2785.83,3259.84 2833.07,3259.84 2880.32,3259.84 2927.56,3259.84 2974.8,3259.84 3022.05,3259.84 3069.29,3259.84 3116.54,3259.84 3305.51,3259.84 3352.76,3259.84 4250.39,3259.84 4486.61,3259.84 4628.35,3259.84 4675.59,3259.84 45.67,3307.09 281.89,3307.09 329.13,3307.09 376.38,3307.09 565.35,3307.09 612.6,3307.09 659.84,3307.09 707.09,3307.09 754.33,3307.09 801.57,3307.09 848.82,3307.09 896.06,3307.09 943.31,3307.09 990.55,3307.09 1037.8,3307.09 1085.04,3307.09 1132.28,3307.09 1179.53,3307.09 1226.77,3307.09 1274.02,3307.09 1321.26,3307.09 1368.5,3307.09 1415.75,3307.09 1462.99,3307.09 1510.24,3307.09 1557.48,3307.09 1604.72,3307.09 1651.97,3307.09 1840.94,3307.09 1888.19,3307.09 2549.61,3307.09 2596.85,3307.09 2644.09,3307.09 2691.34,3307.09 2738.58,3307.09 2785.83,3307.09 2833.07,3307.09 2880.32,3307.09 2927.56,3307.09 2974.8,3307.09 3022.05,3307.09 3069.29,3307.09 3116.54,3307.09 3258.27,3307.09 3305.51,3307.09 3352.76,3307.09 3400,3307.09 3541.73,3307.09 4155.91,3307.09 4203.15,3307.09 4250.39,3307.09 4297.64,3307.09 4344.88,3307.09 4392.13,3307.09 4675.59,3307.09 329.13,3354.33 376.38,3354.33 423.62,3354.33 470.87,3354.33 518.11,3354.33 565.35,3354.33 612.6,3354.33 659.84,3354.33 707.09,3354.33 754.33,3354.33 801.57,3354.33 848.82,3354.33 896.06,3354.33 943.31,3354.33 990.55,3354.33 1037.8,3354.33 1085.04,3354.33 1132.28,3354.33 1179.53,3354.33 1226.77,3354.33 1274.02,3354.33 1321.26,3354.33 1368.5,3354.33 1415.75,3354.33 1462.99,3354.33 1510.24,3354.33 1557.48,3354.33 1604.72,3354.33 1651.97,3354.33 1699.21,3354.33 1746.46,3354.33 1793.7,3354.33 1840.94,3354.33 1888.19,3354.33 1982.68,3354.33 2029.92,3354.33 2077.17,3354.33 2124.41,3354.33 2171.65,3354.33 2218.9,3354.33 2266.14,3354.33 2407.87,3354.33 2549.61,3354.33 2596.85,3354.33 2644.09,3354.33 2691.34,3354.33 2738.58,3354.33 2785.83,3354.33 2833.07,3354.33 2880.32,3354.33 2927.56,3354.33 2974.8,3354.33 3022.05,3354.33 3069.29,3354.33 3116.54,3354.33 3258.27,3354.33 3305.51,3354.33 3352.76,3354.33 3494.49,3354.33 3541.73,3354.33 3636.22,3354.33 4155.91,3354.33 4203.15,3354.33 4250.39,3354.33 4297.64,3354.33 4344.88,3354.33 4392.13,3354.33 329.13,3401.57 376.38,3401.57 423.62,3401.57 470.87,3401.57 518.11,3401.57 565.35,3401.57 612.6,3401.57 659.84,3401.57 707.09,3401.57 754.33,3401.57 801.57,3401.57 848.82,3401.57 896.06,3401.57 943.31,3401.57 990.55,3401.57 1037.8,3401.57 1085.04,3401.57 1132.28,3401.57 1179.53,3401.57 1226.77,3401.57 1274.02,3401.57 1321.26,3401.57 1368.5,3401.57 1415.75,3401.57 1462.99,3401.57 1510.24,3401.57 1557.48,3401.57 1604.72,3401.57 1651.97,3401.57 1699.21,3401.57 1746.46,3401.57 1793.7,3401.57 1840.94,3401.57 1888.19,3401.57 1982.68,3401.57 2029.92,3401.57 2077.17,3401.57 2124.41,3401.57 2171.65,3401.57 2218.9,3401.57 2266.14,3401.57 2407.87,3401.57 2549.61,3401.57 2596.85,3401.57 2644.09,3401.57 2691.34,3401.57 2738.58,3401.57 2785.83,3401.57 2833.07,3401.57 2880.32,3401.57 2927.56,3401.57 2974.8,3401.57 3022.05,3401.57 3069.29,3401.57 3116.54,3401.57 3258.27,3401.57 3305.51,3401.57 3352.76,3401.57 3636.22,3401.57 4108.66,3401.57 4155.91,3401.57 4203.15,3401.57 4250.39,3401.57 4297.64,3401.57 4344.88,3401.57 4392.13,3401.57 281.89,3448.82 329.13,3448.82 376.38,3448.82 423.62,3448.82 470.87,3448.82 518.11,3448.82 565.35,3448.82 612.6,3448.82 659.84,3448.82 707.09,3448.82 754.33,3448.82 801.57,3448.82 848.82,3448.82 896.06,3448.82 943.31,3448.82 990.55,3448.82 1037.8,3448.82 1085.04,3448.82 1132.28,3448.82 1179.53,3448.82 1226.77,3448.82 1274.02,3448.82 1321.26,3448.82 1368.5,3448.82 1415.75,3448.82 1462.99,3448.82 1510.24,3448.82 1557.48,3448.82 1604.72,3448.82 1651.97,3448.82 1699.21,3448.82 1746.46,3448.82 1793.7,3448.82 1840.94,3448.82 1888.19,3448.82 2029.92,3448.82 2077.17,3448.82 2124.41,3448.82 2171.65,3448.82 2218.9,3448.82 2360.63,3448.82 2549.61,3448.82 2596.85,3448.82 2644.09,3448.82 2691.34,3448.82 2738.58,3448.82 2785.83,3448.82 2833.07,3448.82 2880.32,3448.82 2927.56,3448.82 2974.8,3448.82 3022.05,3448.82 3069.29,3448.82 3116.54,3448.82 3163.78,3448.82 3211.02,3448.82 3258.27,3448.82 3305.51,3448.82 3352.76,3448.82 3636.22,3448.82 4108.66,3448.82 4155.91,3448.82 4203.15,3448.82 4250.39,3448.82 4297.64,3448.82 4344.88,3448.82 4392.13,3448.82 3766.73,3464.57 4032.48,3464.57 45.67,3496.06 234.65,3496.06 281.89,3496.06 329.13,3496.06 376.38,3496.06 423.62,3496.06 470.87,3496.06 518.11,3496.06 565.35,3496.06 612.6,3496.06 659.84,3496.06 707.09,3496.06 754.33,3496.06 801.57,3496.06 848.82,3496.06 896.06,3496.06 943.31,3496.06 990.55,3496.06 1037.8,3496.06 1085.04,3496.06 1132.28,3496.06 1179.53,3496.06 1226.77,3496.06 1274.02,3496.06 1321.26,3496.06 1368.5,3496.06 1415.75,3496.06 1462.99,3496.06 1510.24,3496.06 1557.48,3496.06 1604.72,3496.06 1651.97,3496.06 1699.21,3496.06 1746.46,3496.06 1793.7,3496.06 1840.94,3496.06 1888.19,3496.06 1982.68,3496.06 2029.92,3496.06 2077.17,3496.06 2124.41,3496.06 2171.65,3496.06 2218.9,3496.06 2266.14,3496.06 2360.63,3496.06 2407.87,3496.06 2455.12,3496.06 2502.36,3496.06 2549.61,3496.06 2596.85,3496.06 2644.09,3496.06 2691.34,3496.06 2738.58,3496.06 2785.83,3496.06 2833.07,3496.06 2880.32,3496.06 2927.56,3496.06 2974.8,3496.06 3022.05,3496.06 3069.29,3496.06 3116.54,3496.06 3163.78,3496.06 3211.02,3496.06 3258.27,3496.06 3305.51,3496.06 3352.76,3496.06 3636.22,3496.06 4108.66,3496.06 4155.91,3496.06 4203.15,3496.06 4250.39,3496.06 4297.64,3496.06 4344.88,3496.06 4392.13,3496.06 4675.59,3496.06
INT_N15: C222.2 C223.2 F201.1 U220.7 | length 1556.2
  Top Layer w31.5: v4(3804.29,2515.91) 3847.44,2559.06 ; C223.2@3856.3,2657.48 3856.3,2607.22 3847.44,2598.36 3847.44,2559.06 ; U220.7@3946.46,2283.46 3847.44,2382.48 3847.44,2559.06 ; F201.1@4329.13,2952.76 4389.44,2952.76 v2(4393.88,2952.76)
  GND L3 w31.5: U220.7@3946.46,2283.46 4051.88,2388.89 4221.34,2388.89 4349.95,2517.5 4349.95,2908.83 v2(4393.88,2952.76)
  Bottom Layer w31.5: v4(3804.29,2515.91) 3839.88,2480.32 C222.2@3847.44,2480.31
INV_I: R700.2 R701.2 U700.2 | length 724.6
  Bottom Layer w5.91: U700.2@3386.02,1352.95 v1(3452.95,1400.2)
  Bottom Layer w7.87: R700.2@2961.61,1496.06 3060.04,1496.06 3071.85,1507.87 3075.79,1507.87 3103.35,1535.43 3170.28,1535.43 3174.21,1539.37 3229.33,1539.37 3252.95,1562.99 3256.89,1562.99 3260.83,1566.93 3304.13,1566.93 3335.63,1535.43 R701.2@3336.42,1535.43 3336.42,1534.06 3360.04,1510.43 3391.54,1510.43 3426.97,1475 3434.84,1475 3438.78,1471.06 3450.59,1471.06 3458.46,1463.19 3458.46,1451.38 3462.4,1447.44 3462.4,1443.5 3466.34,1439.57 3466.34,1412.01 3454.53,1400.2 v1(3452.95,1400.2)
INV_PHI: R900.2 R901.2 U900.2 | length 736.7
  GND L3 w7.87: v1(3266.89,250.59) 3376.89,360.59 v1(3376.89,433.07)
  Bottom Layer w7.87: R900.2@2981.3,374.02 3071.85,374.02 3159.07,461.24 3295.91,461.24 3311.74,445.41 3311.74,433.07 R901.2@3336.42,433.07 v1(3376.89,433.07) ; U900.2@3208.86,250.59 v1(3266.89,250.59)
INV_Q: R800.2 R801.2 U800.2 | length 781.7
  GND L3 w7.87: v1(3307.02,797.62) 3307.02,937.39 v1(3326,956.37)
  Bottom Layer w7.87: R800.2@2932.09,1043.31 2956.76,1043.31 2956.76,1055.13 2968.57,1066.94 3133.37,1066.94 3136.11,1069.68 3259.41,1069.68 3331.43,997.66 3331.43,984.25 ; U800.2@3208.86,801.77 3257.15,801.77 3261.31,797.62 v1(3307.02,797.62) ; v1(3326,956.37) 3331.43,961.8 3331.43,984.25 ; R801.2@3356.1,984.25 3331.43,984.25
LDO_BYP: C216.1 U212.4 | length 216.6
  Top Layer w7.87: U212.4@3445.87,1539.17 3494.16,1539.17 3494.16,1517.45 3464.89,1488.18 3464.89,1428.74 3476.31,1417.32 C216.1@3505.91,1417.32
MCU_3V3: C302.1 C404.1 C602.1 C1005.1 R401.1 R402.1 R403.1 R600.1 R601.1 R1004.1 U300.36 U302.5 U400.16 U600.8 U600.9 U600.10 U600.16 U1001.5 | length 6519.6
  Top Layer w9.84: 1902.24,1948.82 v1(1902.24,2035.43) ; C302.1@2246.06,1968.5 2289.37,2011.81 2289.37,2015.75 2297.24,2023.62 2297.24,2031.5 2301.18,2035.43 2301.18,2039.37 2305.12,2039.37 2309.06,2043.31 2312.99,2043.31 2328.74,2059.06 2332.68,2059.06 2336.61,2062.99 2356.3,2062.99 2360.24,2059.06 2364.17,2059.06 2383.86,2039.37 2498.03,2039.37 2501.97,2035.43 2509.84,2035.43 2584.65,1960.63 v1(2612.2,1960.63) ; v1(2714.57,1818.9) v1(2927.17,1606.3)
  Top Layer w15.75: v1(1902.44,1836.61) 1902.44,2001.97 v1(1922.13,2021.65) ; v1(1949.68,2015.75) 2020.55,1944.88 2099.29,1944.88 2103.23,1940.94 2178.03,1940.94 2185.91,1948.82 2213.46,1948.82 2217.4,1952.76 2221.34,1952.76 2225.28,1956.69 2233.15,1956.69 2244.96,1968.5 C302.1@2246.06,1968.5 2279.59,1968.5 2279.59,2139.9 2303.08,2163.39 U302.5@2338.58,2163.39 ; v1(2279.33,2153.54) 2287.2,2153.54 2295.08,2161.42 2338.39,2161.42 U302.5@2338.58,2163.39 ; v1(2408.6,2258.93) 2374.08,2224.42 2374.08,2163.39 U302.5@2338.58,2163.39
  GND L3 w9.84: v1(2612.2,1960.63) 2612.2,1921.26 v1(2714.57,1818.9) ; v1(2927.17,1606.3) 2970.47,1562.99 2970.47,1555.12 2974.41,1551.18 2974.41,1543.31 2970.47,1539.37 2970.47,1531.5 2966.54,1527.56 2966.54,1492.13 2962.6,1488.19 2962.6,1484.25 2958.66,1480.31 2958.66,1196.85 2962.6,1192.91 2962.6,1185.04 2970.47,1177.17 2970.47,1137.8 2974.41,1133.86 2974.41,1070.87 2998.03,1047.24 2998.03,1039.37 3001.97,1035.43 3001.97,1015.75 3025.59,992.13 v1@3025.59,984.25
  GND L3 w15.75: v1(3024.94,983.46) 3024.94,950.6 3072.2,903.34 v1(3072.2,472.44)
  Bottom Layer w9.84: U400.16@1815.63,2050.2 1815.63,2051.18 1855,2051.18 1858.94,2055.12 1886.5,2055.12 1894.37,2047.24 1894.37,2043.31 v1(1902.24,2035.43) ; C1005.1@2989.47,1023.62 2990.16,1023.62 3001.97,1011.81 3001.97,1007.87 v1@3025.59,984.25
  Bottom Layer w15.75: R403.1@1616.34,1572.83 1644.95,1572.83 1644.95,1551.38 1656.89,1539.44 1796.87,1539.44 1945.66,1688.22 1945.66,1750.66 1932.61,1763.71 1903.27,1763.71 C404.1@1903.27,1797.24 1903.27,1830.78 1908.48,1830.78 1918.19,1840.48 R402.1@1918.19,1872.05 1906.38,1860.24 1906.38,1840.55 v1(1902.44,1836.61) ; v1(1922.13,2021.65) 1922.13,1990.16 1918.19,1986.22 R401.1@1918.19,1984.25 v1(1949.68,2015.75) ; C602.1@2277.6,2395.67 2277.6,2362.14 2305.46,2362.14 2322.37,2345.23 2322.37,2339.57 R600.1@2350.98,2339.57 2350.98,2338.58 2366.73,2322.83 2370.67,2322.83 2382.48,2311.02 2382.48,2307.09 2386.42,2303.15 2386.42,2287.4 2382.48,2283.46 2382.48,2279.53 2370.67,2267.72 2366.73,2267.72 2362.8,2263.78 U600.8@2362.01,2263.78 2362.01,2238.12 2387.53,2238.12 U600.9@2387.6,2238.19 ; v1(2279.33,2153.54) U600.16@2302.95,2153.54 ; U600.10@2387.6,2218.5 U600.9@2387.6,2238.19 ; v1(2408.6,2258.93) 2387.85,2238.19 U600.9@2387.6,2238.19 ; R1004.1@2681.3,738.19 2681.3,706.63 2680.56,705.88 2680.56,651.68 2683.86,648.37 2683.86,612.07 2748.5,547.43 2841.25,547.43 2888.68,500 2888.68,490.48 2906.72,472.44 U1001.5@2925.2,472.44 v1(3072.2,472.44) ; C1005.1@2989.47,1023.62 3023,1023.62 3024.94,1021.68 v1(3024.94,983.46) ; U300.36@3184.65,2990.94 2561.85,2368.15 R601.1@2561.85,2276.18 2560.83,2277.56 2533.27,2305.12 2533.27,2312.99 2529.33,2316.93 2529.33,2320.87 2513.58,2336.61 2509.65,2336.61 2505.71,2340.55 2466.34,2340.55 2462.4,2344.49 2458.46,2344.49 2454.53,2348.43 2450.59,2348.43 2442.72,2356.3 2442.72,2364.17 2438.78,2364.17 2438.78,2368.11 2434.84,2372.05 2387.6,2372.05 2379.72,2364.17 2379.72,2312.99 2387.6,2305.12 U600.9@2387.6,2238.19
MCU_ARM: R302.1 U300.6 U1000.3 U1000.11 | length 2868.9
  Top Layer w7.87: R302.1@2362.2,2883.27 2476.97,2883.27 U300.6@2484.65,2890.94
  GND L3 w7.87: U300.6@2484.65,2890.94 2590.43,2785.16 2590.43,1534.94 2603.13,1522.23 2603.13,962.09 v1(2724.82,840.41)
  Bottom Layer w7.87: v1(2724.82,840.41) 2731.72,847.31 2937.13,847.31 3001.34,783.1 ; U1000.3@2894.68,673.03 2942.98,673.03 2942.98,724.74 3001.34,783.1 ; U1000.11@3089.57,823.03 3065.42,823.03 3041.27,823.03 3001.34,783.1
MCU_HEARTBEAT: U300.7 U1000.2 | length 2445.5
  GND L3 w7.87: U300.7@2484.65,2790.94 2576.22,2699.37 2576.22,1528.41 2589.29,1515.35 2589.29,744.52 v1(2710.77,623.03)
  Bottom Layer w7.87: v1(2710.77,623.03) U1000.2@2894.68,623.03
MCU_RUN: SW300.1 U300.30 | length 2267.4
  Top Layer w7.87: v1(3006.74,1088.88) 3013.71,1081.91 3013.71,1039.37 SW300.1@3051.18,1039.37 ; v1(3051.18,1559.06) 3011.81,1519.68 3011.81,1452.76 3007.87,1448.82 3007.87,1444.88 2960.63,1397.64 2960.63,1366.14 2972.44,1354.33 2988.19,1354.33 3011.81,1330.71 3043.31,1330.71 SW300.1@3051.18,1322.83 3050.05,1321.17 3030.37,1340.85 3026.43,1340.85 3014.62,1352.66 2975.25,1352.66 2971.31,1356.6 2967.37,1356.6 2963.44,1360.54 2963.44,1364.47 2959.5,1368.41 2959.5,1384.16 2963.44,1388.09 2963.44,1392.03 2971.31,1399.91 2979.18,1399.91 2991,1411.72 2998.87,1411.72 3002.81,1415.65 3061.86,1415.65 3073.67,1403.84 v1(3148.48,1403.84)
  GND L3 w7.87: v1(3006.74,1088.88) 3018.56,1077.07 3018.56,1069.2 3097.3,990.46 3101.23,990.46 3105.17,986.52 3124.85,986.52 3136.67,998.33 3136.67,1021.95 3140.6,1025.89 3140.6,1057.39 3136.67,1061.32 3136.67,1073.13 3116.98,1092.82 3116.98,1372.35 v1(3148.48,1403.84) ; v1(3051.18,1559.06) 3051.18,1826.77 3055.12,1830.71 3055.12,1834.65 3059.06,1838.58 3059.06,1901.57 3066.93,1909.45 3066.93,1980.31 3078.74,1992.13 3078.74,2027.56 3086.61,2035.43 3086.61,2212.6 3098.43,2224.41 3098.43,2267.72 3118.11,2287.4 3118.11,2291.34 3125.98,2299.21 3125.98,2330.71 3185.04,2389.76 U300.30@3184.65,2390.94
MCU_UART_RX: U300.2 U302.4 | length 1410.3
  Top Layer w7.87: U302.4@2338.58,2088.58 2381.89,2088.58 2389.76,2096.46 2405.51,2096.46 2409.45,2100.39 2417.32,2100.39 2433.07,2116.14 v1(2433.07,2120.08)
  GND L3 w7.87: v1(2433.07,2120.08) 2433.07,2116.14 2417.32,2100.39 2409.45,2100.39 2405.51,2096.46 2397.64,2096.46 2393.7,2100.39 2385.83,2100.39 2381.89,2104.33 2381.89,2108.27 2377.95,2112.2 2377.95,2151.57 2381.89,2155.51 2381.89,2962.6 2385.83,2966.54 2385.83,3179.13 2393.7,3187.01 2393.7,3190.94 2413.39,3210.63 2413.39,3214.57 2433.07,3234.25 2433.07,3238.19 U300.2@2484.25,3289.37 ; U300.2@2484.25,3289.37 U300.2@2484.65,3290.94 U300.2@2484.25,3289.37
MCU_UART_TX: U300.1 U301.2 | length 1178.8
  Top Layer w7.87: v1(2184.06,2385.83) 2191.93,2377.95 2195.87,2377.95 2199.8,2374.02 2211.61,2374.02 U301.2@2223.43,2362.2
  Bottom Layer w7.87: v1(2184.06,2385.83) 2184.06,2948.82 2187.99,2952.76 2187.99,2956.69 2191.93,2960.63 2191.93,3023.62 2207.68,3039.37 2207.68,3043.31 2254.92,3090.55 2254.92,3094.49 2258.86,3098.43 2258.86,3102.36 2266.73,3110.24 2266.73,3114.17 2278.54,3125.98 2278.54,3129.92 2298.23,3149.61 2298.23,3153.54 2317.91,3173.23 2317.91,3185.04 2325.79,3192.91 2325.79,3204.72 2341.54,3220.47 2341.54,3224.41 2361.22,3244.09 2361.22,3248.03 2380.91,3267.72 2380.91,3271.65 2400.59,3291.34 2400.59,3295.28 2420.28,3314.96 2420.28,3318.9 2439.96,3338.58 2439.96,3342.52 2459.65,3362.2 2459.65,3366.14 2483.27,3389.76 U300.1@2484.65,3390.94
MID_DIV: C604.1 R602.2 R603.1 U601.3 | length 598.1
  Top Layer w7.87: v1(2252.51,1694.6) 2252.51,1720.85 C604.1@2306.85,1775.2
  GND L3 w7.87: v1(2203.58,1976.97) 2221.6,1958.95 2221.6,1725.51 v1(2252.51,1694.6)
  Bottom Layer w7.87: R602.2@2167.83,2066.34 R603.1@2167.83,1976.97 2195.46,1976.97 v1(2203.58,1976.97) ; U601.3@2195.67,1710.04 2243.96,1710.04 2243.96,1703.14 v1(2252.51,1694.6)